# Altium PCB CarnLog-26.PcbDoc (part 3 of 4)
Units mm, origin at the board's own origin, x right, y up, seen from the top; angles counter-clockwise.
Board outline 109.83 x 61.93 mm, 6 copper layers (Sig/Pwr/Gnd-1, Gnd-2, Sig/Pwr/Gnd-3, Sig/Pwr/Gnd-4, Gnd-5, Sig/Pwr-6), stack 1.491 mm thick; 183 components, 128 nets, 802 pads, 490 vias.
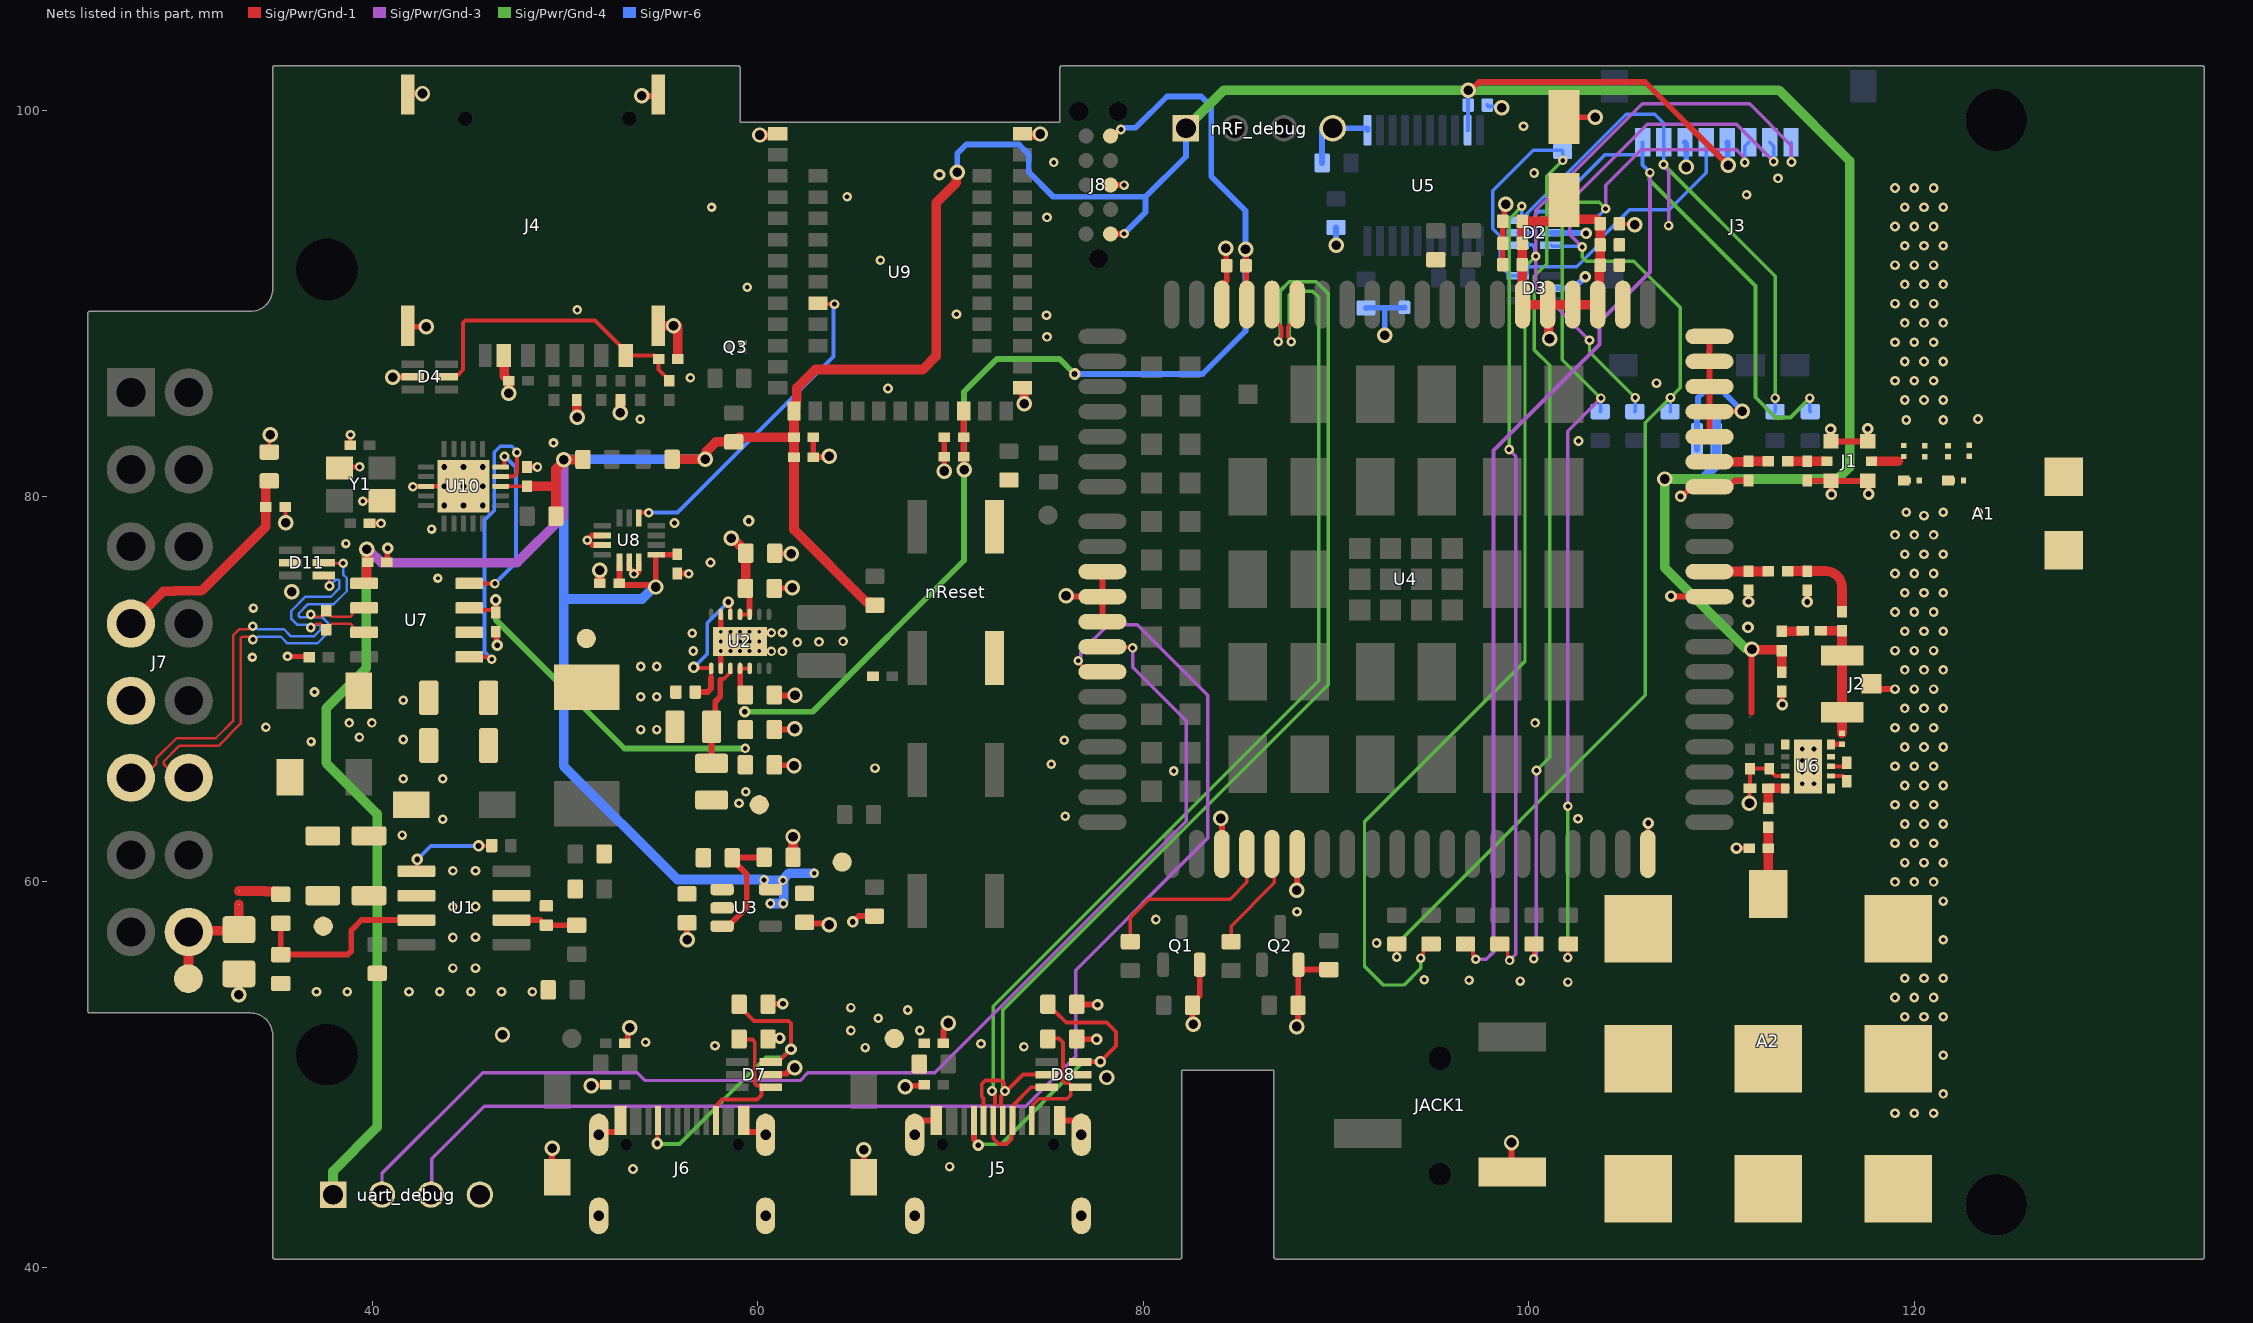
[diagram p6: the nets of this part, all layers, seen from the top]

## Via types
v1: diameter 0.5, hole 0.25, Sig/Pwr/Gnd-1 to Sig/Pwr-6, tented both sides, 370 vias
v2: diameter 0.8, hole 0.5, Sig/Pwr/Gnd-1 to Sig/Pwr-6, tented both sides, 64 vias
v3: diameter 0.6, hole 0.3, Sig/Pwr/Gnd-1 to Sig/Pwr-6, tented both sides, 46 vias
v4: diameter 0.5, hole 0.2, Sig/Pwr/Gnd-1 to Sig/Pwr-6, tented both sides, 10 vias

## Nets (pads, with @x,y where several pads share a name; then routed paths per layer and width w, separated by ;. In a path a pad name is that pad's centre, name@x,y a point inside that pad or via, vN(x,y) a via of type N, cw(c..) or ccw(c..) an arc to the next point about the centre after c; other vN are vias at no path point) (continued)
GND: (continued)
  Sig/Pwr/Gnd-1 w0.3: v2(33.075,54.15) C17.1@33.075,55.232 ; C62.1@39.85,78.6 v1(40.45,78.6) ; C57.1@40.75,76.575 40.775,76.6 40.775,77.28 v3(40.8,77.305) ; v2(41.05,86.175) 41.062,86.187 42.092,86.187 D4.2@42.105,86.2 ; J4.0@41.835,88.85 41.885,88.8 v2(42.8,88.8) ; J4.0@41.835,100.85 41.885,100.9 v2(42.6,100.9) ; C56.2@46.325,72.9 C56.2@46.4,72.975 46.437,72.937 46.437,72.313 v3(46.475,72.275) ; C59.1@48.025,81.525 v1(48.56,81.525) ; v2(49.325,46.175) 49.325,44.947 D5.A@49.588,44.685 ; v2(51.35,49.425) 51.375,49.45 51.95,49.45 51.975,49.475 C52.2@52.1,49.475 ; J6.SH@51.75,46.875 51.9,47.025 52.725,47.025 52.875,47.175 J6.A1B12@52.875,47.625 ; U8.3@51.925,77.475 51.426,77.475 51.176,77.725 v1(51.15,77.725) 51.4,77.975 U8.2@51.925,77.975 ; C53.2@53.1,51.625 53.2,51.725 53.25,51.725 53.25,52.19 53.35,52.29 v2(53.35,52.425) ; U8.6@53.325,76.575 53.325,76.275 53.532,76.068 53.532,76.023 v1(53.575,75.98) ; v1@53.51,75.915 53.613,76.018 53.743,76.018 53.825,76.1 U8.7@53.825,76.575 ; v2(53.969,100.779) 54.825,100.779 J4.0@54.825,100.85 ; C61.2@55.825,76 56.399,76 v1(56.413,75.986) ; C15.1@56.325,57.875 56.33,57.87 56.33,57.002 v2(56.336,56.997) ; U2.2@58.075,71.075 U2.16@58.075,71.975 ; U2.18@58.075,72.975 U2.13@58.075,73.875 ; J6.B1A12@59.275,47.625 59.275,47.175 59.425,47.025 60.25,47.025 J6.SH@60.4,46.875 ; R42.1@60.525,51.85 60.548,51.873 61.116,51.873 v3(61.138,51.895) ; R43.1@60.525,53.65 60.537,53.663 61.287,53.663 v3(61.3,53.675) ; D7.2@60.67,50 60.72,50.05 61.471,50.05 61.782,50.361 v2(61.917,50.361) ; C13.1@60.85,66.075 60.875,66.05 61.85,66.05 v2(61.875,66.025) ; C12.1@60.85,67.9 61.874,67.9 v2(61.923,67.949) ; C11.1@60.85,69.7 60.875,69.675 v2(61.925,69.675) ; C10.1@60.85,75.225 60.862,75.238 61.763,75.238 v2(61.775,75.25) ; C9.1@60.875,77.05 60.888,77.037 61.713,77.037 v2(61.725,77.025) ; C14.1@62.425,57.9 62.488,57.838 63.637,57.838 v2(63.7,57.775) ; C64.1@62.875,83.075 C63.1@62.875,82.025 62.9,82.05 63.675,82.05 v2(63.7,82.075) ; v3(64.925,57.925) 64.939,57.925 65.239,58.225 R11.1@66.05,58.225 ; D6.A@65.5,44.685 v2(65.5,46.1) ; v2(67.65,49.375) 67.7,49.425 68.475,49.425 68.525,49.475 C51.2@68.625,49.475 ; J5.SH@68.134,46.875 68.134,47.625 J5.A1B12@69.259,47.625 ; C54.2@69.625,51.625 69.625,52.29 69.875,52.54 v2(69.875,52.675) ; C65.1@69.675,83.075 C66.1@69.675,82.05 69.675,81.319 v2(69.679,81.314) ; J5.B1A12@75.659,47.625 76.784,47.625 J5.SH@76.784,46.875 ; v2(75.989,74.848) 76.037,74.8 U4.9@77.875,74.8 ; R45.1@76.55,51.85 76.563,51.838 77.562,51.838 v3(77.575,51.825) ; R44.1@76.55,53.65 76.562,53.638 77.612,53.638 v3(77.625,53.625) ; U4.10@77.875,73.5 U4.9@77.875,74.8 ; U4.8@77.875,76.1 U4.9@77.875,74.8 ; J8.3@78.3,96.155 78.303,96.153 78.998,96.153 v1(79,96.15) ; v2(82.583,52.604) 82.55,52.636 R13.1@82.55,53.6 82.55,53.7 82.925,54.075 Q1.E@82.925,55.7 ; v2(84.019,63.29) 84.075,63.234 U4.19@84.075,61.45 ; U4.72@84.075,89.95 84.075,90.935 84.325,91.185 C25.2@84.325,91.975 84.3,92 84.3,92.85 v2(84.275,92.875) ; v2(87.955,52.493) 88.025,52.563 R16.1@88.025,53.6 88.037,53.612 88.037,55.688 Q2.E@88.05,55.7 88.05,55.605 88.205,55.45 C26.1@89.625,55.45 ; v2(87.962,59.556) 87.975,59.569 U4.22@87.975,61.45 ; C21.1@98.65,92.025 C22.1@98.65,93.125 C23.1@98.65,94.275 98.725,94.35 98.725,95.075 v2(98.8,95.15) ; v2(99.1,46.475) 99.1,45.225 JACK1.1@99.15,45.175 ; C24.2@101.825,99.675 v2(103.45,99.675) ; v3(107.375,74.825) 107.4,74.8 U4.46@109.375,74.8 ; v3(107.875,80) 107.95,80 108.45,80.5 110.36,80.5 110.685,80.825 C30.1@111.4,80.825 ; 109.35,87.5 109.375,87.525 U4.54@109.375,88.3 ; U4.53@109.375,87 U4.52@109.375,85.7 U4.51@109.375,84.4 ; U4.50@110.225,83.1 U4.50@109.375,83.1 U4.51@109.375,84.4 ; v2(111.075,84.425) 111.063,84.413 109.388,84.413 U4.51@109.375,84.4 ; v3(111.397,74.528) 111.4,74.532 C38.1@111.4,75.125 ; C35.1@113.125,69.875 113.125,69.233 v3(113.158,69.2) ; v3(114.45,74.525) C39.1@114.45,75.125 ; C31.1@114.45,80.825 114.462,80.813 115.662,80.813 J1.2@115.675,80.8 ; v3(115.656,83.478) 115.675,83.46 J1.2@115.675,82.85 J1.2@117.575,82.85 117.575,83.49 v3(117.589,83.504) ; v3(115.7,80.1) 115.687,80.113 115.687,80.788 J1.2@115.675,80.8 ; v3(117.625,80.125) 117.6,80.15 117.6,80.775 J1.2@117.575,80.8 J1.2@115.675,80.8 ; J2.1@117.775,70.275 ccw(c118.05,70.275) 118.05,70 v1(119,70)
  Sig/Pwr/Gnd-1 w0.5: J4.C5@46.805,87.3 46.834,87.271 46.834,86.241 47.025,86.05 47.025,86 C49.1@47.075,86 v2(47.075,85.35) ; C48.1@50.6,85 50.6,84.135 v2(50.631,84.104) ; C58.1@51.8,75.5 v2(51.8,76.175) ; v2(52.865,84.333) 52.875,84.343 C50.1@52.875,85 ; J4.0@54.825,88.85 v2(55.625,88.85) 55.85,88.85 C47.1@55.85,87.125 ; v2(60.1,98.75) 60.105,98.745 60.775,98.745 60.855,98.825 U9.1@61.025,98.825 ; R8.1@61.825,61.275 v2(61.825,62.35) ; U9.25@73.725,85.625 73.806,85.544 73.806,84.819 v2(73.825,84.8) ; U9.37@73.725,98.825 73.895,98.825 73.975,98.745 74.595,98.745 v2(74.65,98.8)
  Sig/Pwr-6 w0.2: C28.1@97.85,100.3 97.915,100.235 98.535,100.235 v2(98.6,100.17)
  Sig/Pwr-6 w0.3: R21.2@89.275,97.3 89.275,99.1 nRF_debug.04@89.83,99.1 91.625,99.1 U5.11@91.625,98.995 ; v2(90,93.025) R22.1@90,93.95 ; R19.1@91.55,89.775 91.562,89.788 92.55,89.788 ; v2(92.525,88.367) 92.525,89.763 92.55,89.788 ; C27.2@93.55,89.8 93.537,89.788 92.55,89.788 ; D3.2@101.165,90.8 102.332,90.8 v3(102.925,91.393) ; D2.2@101.165,93.675 101.182,93.658 102.953,93.658 v3(102.97,93.641) ; J3.6@108.1,98.375 108.162,98.312 v2(108.162,97.088) ; C46.1@108.725,82.425 C45.1@108.725,83.45 C44.1@108.725,84.425 108.775,84.475 108.775,85.125 109.075,85.425 110.075,85.425 v2(111.075,84.425)
  other v1: 53.525,45.1 69.95,45.225 119,48 120,48 121,48 121.5,49 121.5,51 73.8,51.45 57.775,51.5 71.575,51.6 54.175,51.675 119.5,53 120.5,53 121.5,53 119,54 120,54 121,54 37.1,54.3 38.7,54.3 41.9,54.3 43.5,54.3 45.1,54.3 46.7,54.3 48.3,54.3 102.025,54.8 99.55,54.85 96.9,54.9 94.575,54.925 119.5,55 120.5,55 121.5,55 44.175,55.525 45.35,55.525 92.1,56.825 121.5,57 44.175,57.112 45.35,57.125 80.65,58.05 87.975,58.45 44.175,58.7 45.35,58.725 121.5,59 119,60 120,60 121,60 44.175,60.575 45.35,60.575 119.5,61 120.5,61 121.5,61 119,62 120,62 121,62 41.55,62.425 119.5,63 120.5,63 121.5,63 43.65,63.25 102.55,63.275 75.95,63.4 119,64 120,64 121,64 119.5,65 120.5,65 121.5,65 114.188,65.093 114.787,65.093 41.6,65.35 43.65,65.35 114.188,65.694 114.787,65.694 81.575,65.75 66.075,65.9 119,66 120,66 121,66 75.225,66.1 114.188,66.293 114.787,66.293 114.188,66.894 114.787,66.894 119.5,67 120.5,67 121.5,67 75.9,67.35 41.6,67.387 53.925,67.9 54.75,67.9 119,68 120,68 121,68 34.475,68.025 100.325,68.25 119.5,69 120.5,69 121.5,69 41.6,69.425 53.925,69.6 54.75,69.6 120,70 121,70 119.5,71 120.5,71 121.5,71 53.925,71.175 54.75,71.175 60.703,71.958 61.278,71.958 56.65,71.975 119,72 120,72 121,72 62.046,72.424 63.175,72.45 64.425,72.475 56.6,72.9 60.703,72.92 61.278,72.92 119.5,73 120.5,73 121.5,73 119,74 120,74 121,74 119.5,75 120.5,75 121.5,75 119,76 120,76 121,76 57.544,76.566 119.5,77 120.5,77 121.5,77 119,78 120,78 121,78 55.677,78.621 120.5,79 119.58,79.175 121.496,79.175 123.3,79.175 102.575,82.875 119.58,83.965 121.496,83.965 53.9,84 123.3,84.012 119.5,85 120.5,85 121.5,85 66.75,85.6 106.625,85.875 119,86 120,86 121,86 56.5,86.15 119.5,87 120.5,87 121.5,87 119,88 120,88 121,88 75,88.275 119.5,89 120.5,89 121.5,89 74.975,89.4 70.308,89.447 50.625,89.675 119,90 120,90 121,90 59.45,90.85 119.5,91 120.5,91 121.5,91 119,92 120,92 121,92 66.358,92.247 119.5,93 120.5,93 121.5,93 119,94 120,94 121,94 75,94.475 119.5,95 120.5,95 121.5,95 64.63,95.549 111.3,95.65 119,96 120,96 121,96 112.925,96.5 100.275,96.775 75.35,97.33 99.725,99.2
  other v2: 78.1,49.85 46.752,52.073 35.825,75.05
  other v3: 111.372,73.203 59.525,78.725 69.423,96.692
  other v4: 36.825,67.275 37,69.85 33.775,71.65 33.825,74.2 43.4,75.75 38.625,77.55 43.075,78.3 49.4,82.775 57.6,95